# Altium PCB XCZU15EG-F V1.0尺寸图.PcbDoc (part 2 of 2)
Units mil, origin at the board's own origin, x right, y up, seen from the top; angles counter-clockwise.
Board outline 7030 x 5980 mil, 2 copper layers (TOP, BOT), stack 10.74 mil thick; 40 components, 760 nets, 1412 pads, 0 vias.
Unrouted connection lines stored in the file: 737.
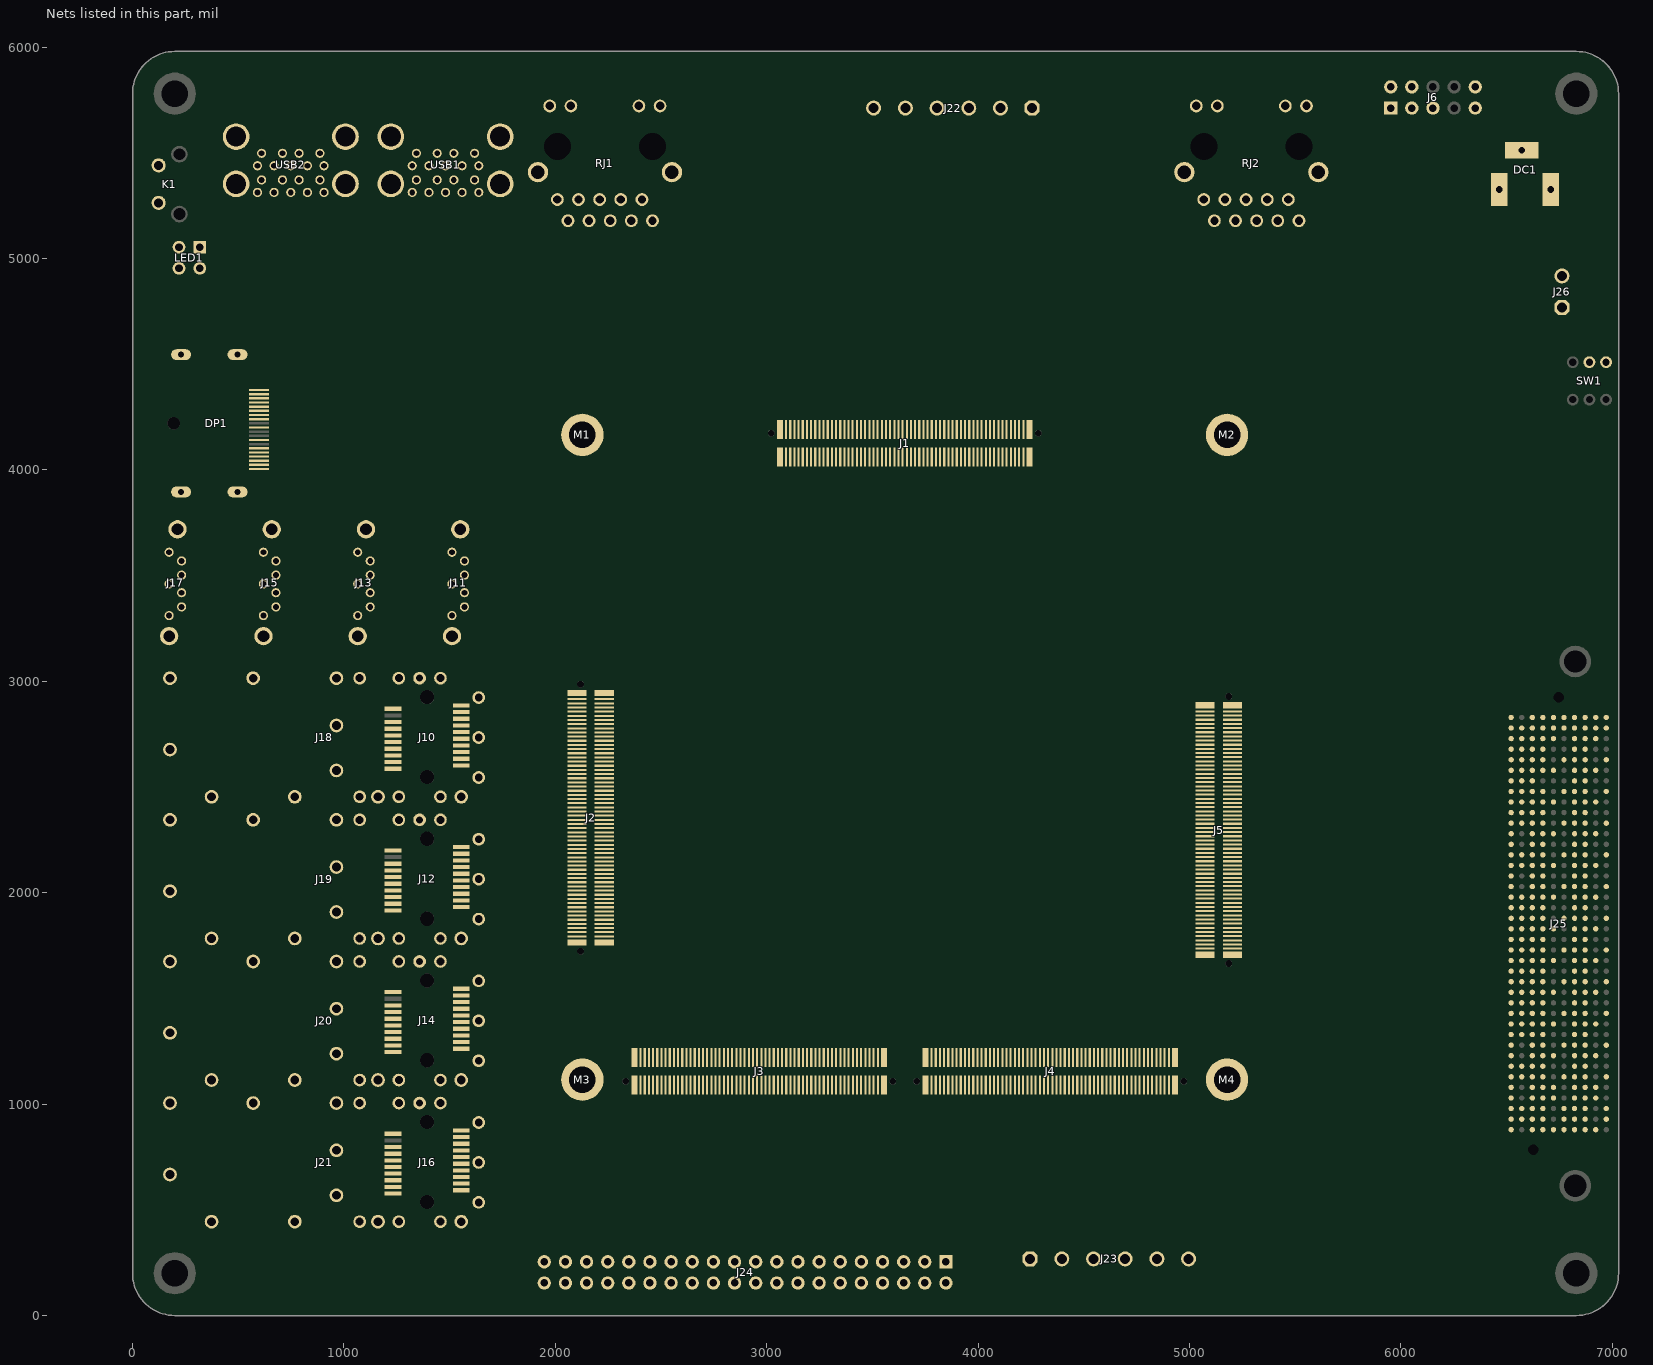
[diagram p2: the nets of this part, all layers, seen from the top]

## Part data
DC1: library part DC-470-2.1GP, BOM_JLCPCB Part Class="Extended Part", BOM_Manufacturer=GANGYUAN, BOM_Manufacturer Part=DC-470-2.1GP, BOM_Supplier=LCSC, BOM_Supplier Part=C194407, Contributor=LCSC, spicePre=D, spiceSymbolName=DC-470-2.1GP
DP1: Current Rating (Max)=500mA, JLCPCB Part Class="Extended Part", LCSC Part Name="DisplayPort 母 P数:20 DP 有弹无卡点", Manufacturer=华宇创, Operating Temperature Range=-25℃~+85℃, Add into BOM=yes, Connector Type=DisplayPort, Convert to PCB=yes, Datasheet=https://atta.szlcsc.com/upload/public/pdf/source/20200812/C711350_819FDC86A5F88806D55082D40EAA95DA.pdf, Device=HYC16-DP20-178, Gender=母, Manufacturer Part=HYC16-DP20-178, Mounting Style=卧贴, Name=HYC16-DP20-178, Number of Pins=20, Number of Rows=-, Supplier=LCSC, Supplier Footprint=SMD, Supplier Part=C711350, Symbol=HYC16-DP20-178
J10 J12 J14 J16: JLCPCB Part Class="Extended Part", LCSC Part Name="SFP 0.8mm P数:20", Manufacturer="TE Connectivity(美国泰科)", Operating Temperature Range=-, Add into BOM=yes, Connector Type=SFP, Convert to PCB=yes, Datasheet=https://atta.szlcsc.com/upload/public/pdf/source/20180424/C210158_9AFB8833F6096AB4A074A402FFBE4003.pdf, Device=1367073-1, Height Above Board=5.4mm, Manufacturer Part=1367073-1, Mounting Style=卧贴, Name=1367073-1, Number of Pins=20, Pitch=0.8mm, Supplier=LCSC, Supplier Footprint=SMD,P=0.8mm, Supplier Part=C210158, Symbol=1367073-1
J18 J19 J20 J21: JLCPCB Part Class="Extended Part", LCSC Part Name=SFP外壳, Manufacturer=HCTL(华灿天禄), Add into BOM=yes, Convert to PCB=yes, Datasheet=https://atta.szlcsc.com/upload/public/pdf/source/20230418/28FB36C4D88CF8CA324EA23CADB75FA2.pdf, Device=HC-SFP-01L, Manufacturer Part=HC-SFP-01L, Name=HC-SFP-01L, Supplier=LCSC, Supplier Footprint=-, Supplier Part=C2897292, Symbol=HC-SFP-01L
J22 J23: library part J-3.81-R-1X06P, "插拔式接线端子（弯针）  品牌：凯峰", 物料编码=6341.000869
J25: library part ASP_134486_0
J26: library part WJ15EDGVC-3.81-2P, "插拔式接线端子（弯针）KF2EDGR-Y-3.81-2P-1G，品牌：凯峰", BOM_Manufacturer=ReliaPro, BOM_Manufacturer Part=WJ15EDGVC-3.81-2P, BOM_Supplier=LCSC, BOM_Supplier Part=C8396, image=//image.lceda.cn/szlcsc/C8396.jpg, spicePre=X, spiceSymbolName=WJ15EDGVC-3.81-2P, 物料编码=6341.000873
K1: Contact Current=50mA, JLCPCB Part Class="Extended Part", LCSC Part Name="7*3.5*1.24mm 卧插 轻触开关", Manufacturer="TE Connectivity(美国泰科)", Voltage Rating (DC)=24V, Actuator Style=圆形按钮, Add into BOM=yes, Circuit=单刀单掷, Convert to PCB=yes, Datasheet=https://atta.szlcsc.com/upload/public/pdf/source/20161105/1478330327555.pdf, Device=1825027-5, Manufacturer Part=1825027-5, Mechanical Life=-, Mounting Style=卧插, Name=1825027-5, Supplier=LCSC, Supplier Footprint=插件, Supplier Part=C86476, Switch Height=1.24mm, Switch Length=7mm, Switch Width=3.5mm, Symbol=1825027-5, With Lamp=-
LED1: Color Temperature=-, Emitted Color=橙红,普绿/黄绿, Forward Current=20mA, JLCPCB Part Class="Extended Part", Lens Color=雾状绿；雾状红, Manufacturer=MEIHUA(美华), Operating Temperature=-25℃~+85℃, Power Dissipation=78mW, Add into BOM=yes, Convert to PCB=yes, Datasheet=https://atta.szlcsc.com/upload/public/pdf/source/20220214/0A6E4FC1FFE28EF73BAB3827A18F262D.pdf, Device=MHK2396EGBTD, Diode Configuration=-, Dominant Wavelength=568nm；628nm, Lamp Holder Type=组装式圆形灯头, LCSC Part Name=橙红,普绿/黄绿, Manufacturer Part=MHK2396EGBTD, Mounting Sytle=-, Name=MHK2396EGBTD, Peak Wavelength=-, Supplier=LCSC, Supplier Footprint=插件, Supplier Part=C2962099, Symbol=MHK2396EGBTD, Viewing Angle=80°
M1 M2 M3 M4 M5 M6 M7 M8: "测试点"
RJ1 RJ2: BOM_JLCPCB Part Class="Extended Part", BOM_Manufacturer=HANRUN, BOM_Manufacturer Part=HR911130A, BOM_Supplier=LCSC, BOM_Supplier Part=C54408, spicePre=R, spiceSymbolName=HR911130A
SW1: BOM_JLCPCB Part Class="Extended Part", BOM_Manufacturer="XKB Enterprise", BOM_Manufacturer Part=XKB5858-Z, BOM_Supplier=LCSC, BOM_Supplier Part=C318868, Contributor=LCSC, spicePre=S, spiceSymbolName=XKB5858-Z
USB1 USB2: Current Rating - Power (Max)=1.8A, JLCPCB Part Class="Extended Part", LCSC Part Name="Type-A 母座 弯插 双层9短体", Manufacturer=XUNPU(讯普), Operating Temperature Range=-30℃~+85℃, Welding Temperature (Max)=260℃, Add into BOM=yes, Connector Type=Type-A, Convert to PCB=yes, Datasheet=https://atta.szlcsc.com/upload/public/pdf/source/20210908/0D45B3E84ED0AF593A84F7C1203CC555.pdf, Device=USB-303WSD-BRY, Gender=母座, Manufacturer Part=USB-303WSD-BRY, Mounting Style=弯插, Name=USB-303WSD-BRY, Number of Contacts=9+9, Number of Ports=2, Standard="USB 3.0", Supplier=LCSC, Supplier Footprint=插件, Supplier Part=C2895028, Symbol=USB-303WSD-BRY
J1 J2 J3 J4 J5: Designer=U?, Device=AXK6A2337YG, Symbol=AXK6A2337YG

## Nets (pads, with @x,y where several pads share a name; then routed paths per layer and width w, separated by ;. In a path a pad name is that pad's centre, name@x,y a point inside that pad or via, vN(x,y) a via of type N, cw(c..) or ccw(c..) an arc to the next point about the centre after c; other vN are vias at no path point)
1.8V: J25.E39 J25.F40 J25.G39 J25.H40 J25.J39 J25.K40
3.3V: J6.4 J24.39 J24.40 J25.C39 J25.D32 J25.D36 J25.D38 J25.D40 LED1.1 LED1.4 RJ1.11 RJ2.11
5V-TC1: 
5V-TC2: 
128_CLK1_N: J2.69
128_CLK1_P: J2.67
129_CLK0_N: J2.81
129_CLK0_P: J2.79
130_CLK0_N: J3.5
130_CLK0_P: J3.3
130_CLK1_N: J3.17
130_CLK1_P: J3.15
130_RX0_N: J3.6
130_RX0_P: J3.4
130_RX1_N: J3.12
130_RX1_P: J3.10
130_RX2_N: J3.18
130_RX2_P: J3.16
130_RX3_N: J3.24
130_RX3_P: J3.22
130_TX0_N: J3.11
130_TX0_P: J3.9
130_TX1_N: J3.23
130_TX1_P: J3.21
130_TX2_N: J3.29
130_TX2_P: J3.27
130_TX3_N: J3.30
130_TX3_P: J3.28
230_CLK0_N: J4.41
230_CLK0_P: J4.39
230_CLK1_N: J4.35
230_CLK1_P: J4.33
230_RX0_N: J4.59
230_RX0_P: J4.57
230_RX1_N: J4.60
230_RX1_P: J4.58
230_RX2_N: J4.54
230_RX2_P: J4.52
230_RX3_N: J4.48
230_RX3_P: J4.46
230_TX0_N: J4.53
230_TX0_P: J4.51
230_TX1_N: J4.47
230_TX1_P: J4.45
230_TX2_N: J4.42
230_TX2_P: J4.40
230_TX3_N: J4.36
230_TX3_P: J4.34
505_CLK3_N: J2.46
505_CLK3_P: J2.44
505_DP_CLK_N: J2.45
505_DP_CLK_P: J2.43
505_DP_CLKCC_N: 
505_DP_CLKCC_P: 
505_PCIE_REFCLK_N: J2.21
505_PCIE_REFCLK_P: J2.19
505_PCIE_REFCLKCC_N: 
505_PCIE_REFCLKCC_P: 
505_RX2_N: J2.28
505_RX2_P: J2.26
505_RX3_N: J2.40
505_RX3_P: J2.38
505_USB_CLK_N: J2.33
505_USB_CLK_P: J2.31
505_USB_CLKCC_N: 
505_USB_CLKCC_P: 
505_USB_CLKCCCC_N: 
505_USB_CLKCCCC_P: 
+5V: J24.2
+12V: J1.5 J1.6 J1.7 J1.8 J1.9 J1.10 J1.11 J1.12 J1.13 J1.14 J1.15 J1.16 J1.17 J1.18 J1.19 J1.20 J1.21 J1.22 J1.23 J1.24 J1.25 J1.26 J1.27 J1.28 J1.29 J1.30 J1.31 J1.32 J1.33 J1.34 J1.35 J1.36 J1.37 J1.38 J1.39 J1.40 J1.41 J1.42 J1.43 J1.44 J1.45 J1.46 J25.C35 J25.C37
AD9523_CS: J3.119
AD9523_EE_SEL: 
AD9523_RST: 
AD9523_SCLK: J3.117
AD9523_SDIO: J3.115
AD9523_SDO: J3.113
B48_L1_N: J3.73
B48_L1_P: J3.75
B48_L2_N: J3.88
B48_L2_P: J3.90
B48_L3_N: J3.77
B48_L3_P: J3.79
B48_L4_N: J3.84
B48_L4_P: J3.86
B48_L5_N: J3.83
B48_L5_P: J3.85
B48_L6_N: J3.87
B48_L6_P: J3.89
B48_L8_N: J3.78
B48_L8_P: J3.80
B50_L1_N: J4.29
B50_L1_P: J4.27
B50_L3_N: J4.30
B50_L3_P: J4.28
B50_L4_N: J4.20
B50_L4_P: J4.18
B50_L5_P: J4.17
B50_L7_N: J4.16
B50_L7_P: J4.14
B50_L8_N: J4.26
B50_L8_P: J4.24
B50_L9_N: J4.10
B50_L9_P: J4.8
B50_L10_N: J4.6
B50_L10_P: J4.4
B66_L4_N: J5.119
CAM1_CLK: J4.5
CAM1_GPIO: J4.3
CAM_SCL: J4.7
CAM_SDA: J4.9
CAN1_H: J22.6
CAN1_L: J22.5
CAN1_RX: 
CAN1_TX: 
CAN2_H: J22.3
CAN2_L: J22.2
CAN2_RX: 
CAN2_TX: 
CH340_UART_RX: 
CH340_UART_TX: 
D01_N: 
D01_P: 
DP_3V3: DP1.20
DP_AUX_IN_MIO30: J1.83
DP_AUX_OUT_MIO27: J1.101
DP_HPD_LS: 
DP_HPD_LS_C: DP1.18
DP_HPD_MIO28: J1.103
DP_OE_MIO29: J1.72
DPAUX_C_N: DP1.17
DPAUX_C_P: DP1.15
DPAUX_N: 
DPAUX_P: 
FAN: J4.19
FMC_CLK0_N: J5.28 J25.H5
FMC_CLK0_P: J5.30 J25.H4
FMC_CLK1_N: J5.80 J25.G3
FMC_CLK1_P: J5.78 J25.G2
FMC_DP0_C2M_N: J4.120 J25.C3
FMC_DP0_C2M_P: J4.118 J25.C2
FMC_DP0_M2C_N: J4.119 J25.C7
FMC_DP0_M2C_P: J4.117 J25.C6
FMC_DP1_C2M_N: J4.114 J25.A23
FMC_DP1_C2M_P: J4.112 J25.A22
FMC_DP1_M2C_N: J4.113 J25.A3
FMC_DP1_M2C_P: J4.111 J25.A2
FMC_DP2_C2M_N: J4.108 J25.A27
FMC_DP2_C2M_P: J4.106 J25.A26
FMC_DP2_M2C_N: J4.107 J25.A7
FMC_DP2_M2C_P: J4.105 J25.A6
FMC_DP3_C2M_N: J4.102 J25.A31
FMC_DP3_C2M_P: J4.100 J25.A30
FMC_DP3_M2C_N: J4.101 J25.A11
FMC_DP3_M2C_P: J4.99 J25.A10
FMC_DP4_C2M_N: J4.89 J25.A35
FMC_DP4_C2M_P: J4.87 J25.A34
FMC_DP4_M2C_N: J4.90 J25.A15
FMC_DP4_M2C_P: J4.88 J25.A14
FMC_DP5_C2M_N: J4.83 J25.A39
FMC_DP5_C2M_P: J4.81 J25.A38
FMC_DP5_M2C_N: J4.84 J25.A19
FMC_DP5_M2C_P: J4.82 J25.A18
FMC_DP6_C2M_N: J4.72 J25.B37
FMC_DP6_C2M_P: J4.70 J25.B36
FMC_DP6_M2C_N: J4.78 J25.B17
FMC_DP6_M2C_P: J4.76 J25.B16
FMC_DP7_C2M_N: J4.71 J25.B33
FMC_DP7_C2M_P: J4.69 J25.B32
FMC_DP7_M2C_N: J4.66 J25.B13
FMC_DP7_M2C_P: J4.64 J25.B12
FMC_GBTCLK0_M2C_N: J4.96 J25.D5
FMC_GBTCLK0_M2C_P: J4.94 J25.D4
FMC_GBTCLK1_M2C_N: J4.77 J25.B21
FMC_GBTCLK1_M2C_P: J4.75 J25.B20
FMC_HDMI_SCL: J4.23 J25.C30
FMC_HDMI_SDA: J4.25 J25.C31
FMC_LA00_CC_N: J5.34 J25.G7
FMC_LA00_CC_P: J5.36 J25.G6
FMC_LA01_CC_N: J5.38 J25.D9
FMC_LA01_CC_P: J5.40 J25.D8
FMC_LA02_N: J5.3 J25.H8
FMC_LA02_P: J5.5 J25.H7
FMC_LA03_N: J5.7 J25.G10
FMC_LA03_P: J5.9 J25.G9
FMC_LA04_N: J5.13 J25.H11
FMC_LA04_P: J5.15 J25.H10
FMC_LA05_N: J5.8 J25.D12
FMC_LA05_P: J5.10 J25.D11
FMC_LA06_N: J5.4 J25.C11
FMC_LA06_P: J5.6 J25.C10
FMC_LA07_N: J5.17 J25.H14
FMC_LA07_P: J5.19 J25.H13
FMC_LA08_N: J5.14 J25.G13
FMC_LA08_P: J5.16 J25.G12
FMC_LA09_N: J5.18 J25.D15
FMC_LA09_P: J5.20 J25.D14
FMC_LA10_N: J5.23 J25.C15
FMC_LA10_P: J5.25 J25.C14
FMC_LA11_N: J5.37 J25.H17
FMC_LA11_P: J5.39 J25.H16
FMC_LA12_N: J5.24 J25.G16
FMC_LA12_P: J5.26 J25.G15
FMC_LA13_N: J5.44 J25.D18
FMC_LA13_P: J5.46 J25.D17
FMC_LA14_N: J5.43 J25.C19
FMC_LA14_P: J5.45 J25.C18
FMC_LA15_N: J5.53 J25.H20
FMC_LA15_P: J5.55 J25.H19
FMC_LA16_N: J5.48 J25.G19
FMC_LA16_P: J5.50 J25.G18
FMC_LA17_CC_N: J5.90 J25.D21
FMC_LA17_CC_P: J5.88 J25.D20
FMC_LA18_CC_N: J5.96 J25.C23
FMC_LA18_CC_P: J5.94 J25.C22
FMC_LA19_N: J5.54 J25.H23
FMC_LA19_P: J5.56 J25.H22
FMC_LA20_N: J5.57 J25.G22
FMC_LA20_P: J5.59 J25.G21
FMC_LA21_N: J5.60 J25.H26
FMC_LA21_P: J5.58 J25.H25
FMC_LA22_N: J5.75 J25.G25
FMC_LA22_P: J5.73 J25.G24
FMC_LA23_N: J5.69 J25.D24
FMC_LA23_P: J5.67 J25.D23
FMC_LA24_N: J5.76 J25.H29
FMC_LA24_P: J5.74 J25.H28
FMC_LA25_N: J5.70 J25.G28
FMC_LA25_P: J5.68 J25.G27
FMC_LA26_N: J5.66 J25.D27
FMC_LA26_P: J5.64 J25.D26
FMC_LA27_N: J5.79 J25.C27
FMC_LA27_P: J5.77 J25.C26
FMC_LA28_N: J5.100 J25.H32
FMC_LA28_P: J5.98 J25.H31
FMC_LA29_N: J5.86 J25.G31
FMC_LA29_P: J5.84 J25.G30
FMC_LA30_N: J5.110 J25.H35
FMC_LA30_P: J5.108 J25.H34
FMC_LA31_N: J5.106 J25.G34
FMC_LA31_P: J5.104 J25.G33
FMC_LA32_N: J5.120 J25.H38
FMC_LA32_P: J5.118 J25.H37
FMC_LA33_N: J5.116 J25.G37
FMC_LA33_P: J5.114 J25.G36
FMC_PG: J25.F1
FMC_PRSNT: J4.15 J25.H2
FMC_TCK: J25.D29
FMC_TDI: J25.D30
FMC_TDO: J25.D31
FMC_TMS: J25.D33
FMC_VREF: J25.H1
FPGA_DONE: J1.54
FPGA_TCK: J1.62 J6.1
FPGA_TDI: J1.68 J6.9
FPGA_TDO: J1.66
FPGA_TMS: J1.64 J6.5
GND: DC1.2 DC1.3 DP1.2 DP1.5 DP1.8 DP1.11 DP1.16 DP1.19 DP1.21 DP1.22 DP1.23 DP1.24 J1.1 J1.2 J1.3 J1.4 J1.47 J1.48 J1.49 J1.50 J1.59 J1.60 J1.69 J1.70 J1.76 J1.79 J1.86 J1.89 J1.99 J1.100 J1.109 J1.114 J1.119 J1.120 J2.1 J2.2 J2.3 J2.4 J2.5 J2.6 J2.7 J2.8 J2.9 J2.10 J2.11 J2.12 J2.17 J2.18 J2.23 J2.24 J2.29 J2.30 J2.35 J2.36 J2.41 J2.42 J2.47 J2.48 J2.53 J2.54 J2.59 J2.60 J2.65 J2.66 J2.71 J2.72 J2.77 J2.78 J2.83 J2.84 J2.89 J2.90 J2.95 J2.96 J2.101 J2.102 J2.107 J2.108 J3.1 J3.2 J3.7 J3.8 J3.13 J3.14 J3.19 J3.20 J3.25 J3.26 J3.31 J3.32 J3.41 J3.42 J3.51 J3.52 J3.61 J3.62 J3.71 J3.72 J3.81 J3.82 J3.91 J3.92 J3.101 J3.102 J3.111 J3.112 J4.1 J4.2 J4.11 J4.12 J4.21 J4.22 J4.31 J4.32 J4.37 J4.38 J4.43 J4.44 J4.49 J4.50 J4.55 J4.56 J4.61 J4.62 J4.67 J4.68 J4.73 J4.74 J4.79 J4.80 J4.85 J4.86 J4.91 J4.92 J4.97 J4.98 J4.103 J4.104 J4.109 J4.110 J4.115 J4.116 J5.1 J5.2 J5.11 J5.12 J5.21 J5.22 J5.31 J5.32 J5.41 J5.42 J5.51 J5.52 J5.61 J5.62 J5.71 J5.72 J5.81 J5.82 J5.91 J5.92 J5.101 J5.102 J5.111 J5.112 J6.2 J6.10 J10.1 J10.10 J10.11 J10.14 J10.17 J10.20 J11.1 J11.4 J11.7 J11.8 J11.9 J12.1 J12.10 J12.11 J12.14 J12.17 J12.20 J13.1 J13.4 J13.7 J13.8 J13.9 J14.1 J14.10 J14.11 J14.14 J14.17 J14.20 J15.1 J15.4 J15.7 J15.8 J15.9 J16.1 J16.10 J16.11 J16.14 J16.17 J16.20 J17.1 J17.4 J17.7 J17.8 J17.9 J18.1 J18.2 J18.3 J18.4 J18.5 J18.6 J18.7 J18.8 J18.9 J18.10 J18.11 J18.12 J18.13 J18.14 J18.15 J18.16 J18.17 J18.18 J18.19 J18.20 J19.1 J19.2 J19.3 J19.4 J19.5 J19.6 J19.7 J19.8 J19.9 J19.10 J19.11 J19.12 J19.13 J19.14 J19.15 J19.16 J19.17 J19.18 J19.19 J19.20 J20.1 J20.2 J20.3 J20.4 J20.5 J20.6 J20.7 J20.8 J20.9 J20.10 J20.11 J20.12 J20.13 J20.14 J20.15 J20.16 J20.17 J20.18 J20.19 J20.20 J21.1 J21.2 J21.3 J21.4 J21.5 J21.6 J21.7 J21.8 J21.9 J21.10 J21.11 J21.12 J21.13 J21.14 J21.15 J21.16 J21.17 J21.18 J21.19 J21.20 J22.1 J22.4 J23.1 J23.4 J24.1 J24.37 J24.38 J25.A1 J25.A4 J25.A5 J25.A8 J25.A9 J25.A12 J25.A13 J25.A16 J25.A17 J25.A20 J25.A21 J25.A24 J25.A25 J25.A28 J25.A29 J25.A32 J25.A33 J25.A36 J25.A37 J25.A40 J25.B2 J25.B3 J25.B6 J25.B7 J25.B10 J25.B11 J25.B14 J25.B15 J25.B18 J25.B19 J25.B22 J25.B23 J25.B26 J25.B27 J25.B30 J25.B31 J25.B34 J25.B35 J25.B38 J25.B39 J25.C1 J25.C4 J25.C5 J25.C8 J25.C9 J25.C12 J25.C13 J25.C16 J25.C17 J25.C20 J25.C21 J25.C24 J25.C25 J25.C28 J25.C29 J25.C32 J25.C33 J25.C34 J25.C36 J25.C38 J25.C40 J25.D2 J25.D3 J25.D6 J25.D7 J25.D10 J25.D13 J25.D16 J25.D19 J25.D22 J25.D25 J25.D28 J25.D35 J25.D37 J25.D39 J25.E1 J25.E4 J25.E5 J25.E8 J25.E11 J25.E14 J25.E17 J25.E20 J25.E23 J25.E26 J25.E29 J25.E32 J25.E35 J25.E38 J25.E40 J25.F2 J25.F3 J25.F6 J25.F9 J25.F12 J25.F15 J25.F18 J25.F21 J25.F24 J25.F27 J25.F30 J25.F33 J25.F36 J25.F39 J25.G1 J25.G4 J25.G5 J25.G8 J25.G11 J25.G14 J25.G17 J25.G20 J25.G23 J25.G26 J25.G29 J25.G32 J25.G35 J25.G38 J25.G40 J25.H3 J25.H6 J25.H9 J25.H12 J25.H15 J25.H18 J25.H21 J25.H24 J25.H27 J25.H30 J25.H33 J25.H36 J25.H39 J25.J1 J25.J4 J25.J5 J25.J8 J25.J11 J25.J14 J25.J17 J25.J20 J25.J23 J25.J26 J25.J29 J25.J32 J25.J35 J25.J38 J25.J40 J25.K2 J25.K3 J25.K6 J25.K9 J25.K12 J25.K15 J25.K18 J25.K21 J25.K24 J25.K27 J25.K30 J25.K33 J25.K36 J25.K39 J26.2 K1.1 M1.1 M2.1 M3.1 M4.1 RJ1.10 RJ1.15 RJ1.16 RJ2.10 RJ2.15 RJ2.16 USB1.4 USB1.7 USB1.13 USB1.16 USB1.19 USB1.20 USB1.21 USB1.22 USB2.4 USB2.7 USB2.13 USB2.16 USB2.19 USB2.20 USB2.21 USB2.22
GT0_DP_TX_C_N: DP1.3
GT0_DP_TX_C_P: DP1.1
GT0_DP_TX_N: J2.39
GT0_DP_TX_P: J2.37
GT1_DP_TX_C_N: DP1.6
GT1_DP_TX_C_P: DP1.4
GT1_DP_TX_N: J2.34
GT1_DP_TX_P: J2.32
HUB_3.3V: 
HUB_AV12: 
HUB_DV12: 
HUB_RESET: 
IO1_N: J3.74 J24.3
IO1_P: J3.76 J24.4
IO2_N: J3.67 J24.5
IO2_P: J3.69 J24.6
IO3_N: J3.68 J24.7
IO3_P: J3.70 J24.8
IO4_N: J3.63 J24.9
IO4_P: J3.65 J24.10
IO5_N: J3.64 J24.11
IO5_P: J3.66 J24.12
IO6_N: J3.57 J24.13
IO6_P: J3.59 J24.14
IO7_N: J3.58 J24.15
IO7_P: J3.60 J24.16
IO8_N: J3.53 J24.17
IO8_P: J3.55 J24.18
IO9_N: J3.54 J24.19
IO9_P: J3.56 J24.20
IO10_N: J3.47 J24.21
IO10_P: J3.49 J24.22
IO11_N: J3.48 J24.23
IO11_P: J3.50 J24.24
IO12_N: J3.43 J24.25
IO12_P: J3.45 J24.26
IO13_N: J3.44 J24.27
IO13_P: J3.46 J24.28
IO14_N: J3.37 J24.29
IO14_P: J3.39 J24.30
IO15_N: J3.38 J24.31
IO15_P: J3.40 J24.32
IO16_N: J3.33 J24.33
IO16_P: J3.35 J24.34
IO17_N: J3.34 J24.35
IO17_P: J3.36 J24.36
JTAG_TDO: J6.3
MIPI1_CLK_N: J5.63
MIPI1_CLK_P: J5.65
MIPI1_LAN0_N: J5.33
MIPI1_LAN0_P: J5.35
MIPI1_LAN1_N: J5.47
MIPI1_LAN1_P: J5.49
NetB1_1: 
NetB1_2: 
NetB1_3: 
NetB1_4: 
NetC8_2: 
NetC11_1: RJ1.1
NetC26_2: 
NetC29_1: RJ2.1
NetC44_2: 
NetC50_2: 
NetC55_1: 
NetC55_2: 
NetC57_2: 
NetC135_2: 
NetC138_2: 
NetC202_1: J10.16
NetC208_2: J10.15
NetC212_1: J12.16
NetC218_2: J12.15
NetC222_1: J14.16
NetC228_2: J14.15
NetC232_1: J16.16
NetC238_2: J16.15
NetC246_2: 
NetC248_2: 
NetC273_1: 
NetC273_2: 
NetC282_2: 
NetC283_2: 
NetC284_2: 
NetC291_1: 
NetC291_2: 
NetC300_2: 
NetC301_2: 
NetC302_2: 
NetC303_1: 
NetC303_2: 
NetC312_2: 
NetC313_2: 
NetC314_2: 
NetD2_2: 
NetD13_A: 
NetD13_K: SW1.2
NetD14_1: DC1.1 J26.1
NetD15_A: 
NetD15_K: 
NetDP1_13: DP1.13
NetDP1_14: DP1.14
NetJ9_69: 
NetJ10_4: J10.4
NetJ10_5: J10.5
NetJ10_6: J10.6
NetJ10_7: J10.7
NetJ10_9: J10.9
NetJ12_4: J12.4
NetJ12_5: J12.5
NetJ12_6: J12.6
NetJ12_7: J12.7
NetJ12_9: J12.9
NetJ14_4: J14.4
NetJ14_5: J14.5
NetJ14_6: J14.6
NetJ14_7: J14.7
NetJ14_9: J14.9
NetJ16_4: J16.4
NetJ16_5: J16.5
NetJ16_6: J16.6
NetJ16_7: J16.7
NetJ16_9: J16.9
NetL15_1: 
NetL17_1: 
NetL19_1: 
NetL21_1: 
NetL22_1: 
NetLED1_2: LED1.2
NetLED1_3: LED1.3
NetLED2_K: 
NetLED3_K: 
NetLED4_K: 
NetLED5_K: 
NetLED6_K: 
NetLED7_K: 
NetLED8_K: 
NetLED9_K: 
NetQ1_1: 
NetQ1_3: 
NetQ2_1: 
NetQ2_3: 
NetQ3_3: 
NetQ4_1: 
NetQ4_3: 
NetQ5_1: 
NetQ5_3: 
NetQ6_1: 
NetQ6_3: 
NetQ7_1: 
NetQ7_3: 
NetQ8_1: 
NetQ8_3: 
NetQ9_1: 
NetQ9_3: 
NetQ10_3: 
NetQ11_1: 
NetQ12_1: SW1.3
NetR7_2: 
NetR33_1: RJ1.12
NetR34_2: RJ1.13
NetR35_1: 
NetR50_1: RJ2.12
NetR51_2: RJ2.13
NetR52_1: 
NetR65_1: 
NetR66_2: 
NetR68_2: 
NetR70_2: 
NetR71_1: 
NetR85_2: 
NetR86_2: 
NetR87_1: 
NetR88_1: 
NetR89_1: 
NetR98_1: 
NetR100_2: 
NetR101_2: 
NetR104_2: 
NetR106_2: 
NetR107_2: 
NetR139_1: 
NetR140_1: 
NetR141_1: 
NetR142_1: 
NetR144_1: 
NetR145_2: 
NetR146_1: 
NetR147_2: 
NetR160_2: 
NetR162_2: 
NetR165_2: 
NetR168_2: 
NetR169_2: 
NetR175_2: 
NetR177_2: 
NetSD1_1: 
NetSD1_5: 
NetSD1_7: 
NetSD1_8: 
NetU4_10: 
NetU5_11: 
NetU5_12: 
NetU5_13: 
OVCUR1#: 
OVCUR2#: 
OVCUR3#: 
OVCUR4#: 
P_SPI_CK: 
P_SPI_CZ: 
P_SPI_DI: 
P_SPI_DO: 
PCIE_PEDET_MIO36: J1.81
PCIE_REFCLK_N: 
PCIE_REFCLK_P: 
PCIE_REFCLKCC_N: 
PCIE_REFCLKCC_P: 
PCIE_RST_N: 
PCIE_RST_N_MIO37: J1.95
PCIE_RX_C_N: J2.16
PCIE_RX_C_P: J2.14
PCIE_TX_C_N: 
PCIE_TX_C_P: 
PCIE_TX_N: J2.15
PCIE_TX_P: J2.13
PG_1.8V: 
PG_3.3V: 
PG_5V: 
PGND: 
PHY1_ADVDDL: 
PHY1_AVDD33: 
PHY1_DVDDL: 
PHY1_INT_N: 
PHY1_IODVDD: 
PHY1_LED1: RJ1.14
PHY1_LED2: 
PHY1_MDC: J1.118
PHY1_MDI0_N: RJ1.3
PHY1_MDI0_P: RJ1.2
PHY1_MDI1_N: RJ1.7
PHY1_MDI1_P: RJ1.4
PHY1_MDI2_N: RJ1.6
PHY1_MDI2_P: RJ1.5
PHY1_MDI3_N: RJ1.9
PHY1_MDI3_P: RJ1.8
PHY1_MDIO: J1.116
PHY1_REGOUT: 
PHY1_RSET: 
PHY1_RXCK: J1.88
PHY1_RXCTL: J1.90
PHY1_RXD0: J1.92
PHY1_RXD1: J1.94
PHY1_RXD2: J1.96
PHY1_RXD3: J1.98
PHY1_TXCK: J1.102
PHY1_TXCTL: J1.104
PHY1_TXD0: J1.106
PHY1_TXD1: J1.108
PHY1_TXD2: J1.110
PHY1_TXD3: J1.112
PHY1_XI: 
PHY1_XO: 
PHY2_ADVDDL: 
PHY2_AVDD33: 
PHY2_DVDDL: 
PHY2_INT_N: 
PHY2_IODVDD: 
PHY2_LED1: RJ2.14
PHY2_LED2: 
PHY2_MDC: J5.85
PHY2_MDI0_N: RJ2.3
PHY2_MDI0_P: RJ2.2
PHY2_MDI1_N: RJ2.7
PHY2_MDI1_P: RJ2.4
PHY2_MDI2_N: RJ2.6
PHY2_MDI2_P: RJ2.5
PHY2_MDI3_N: RJ2.9
PHY2_MDI3_P: RJ2.8
PHY2_MDIO: J5.87
PHY2_REGOUT: 
PHY2_RSET: 
PHY2_RST: J5.83
PHY2_RXCK: J5.93
PHY2_RXCTL: J5.117
PHY2_RXD0: J5.115
PHY2_RXD1: J5.113
PHY2_RXD2: J5.109
PHY2_RXD3: J5.107
PHY2_TXCK: J5.105
PHY2_TXCTL: J5.103
PHY2_TXD0: J5.99
PHY2_TXD1: J5.97
PHY2_TXD2: J5.95
PHY2_TXD3: J5.89
PHY2_XI: 
PHY2_XO: 
PL_CH340_N: 
PL_CH340_P: 
PL_KEY1: J3.98
PL_KEY2: J3.100
PL_LED1: J3.94
PL_LED2: J3.96
PL_UART_RX: J3.104
PL_UART_TX: J3.106
PLL_128_CLK0_N: J2.57
PLL_128_CLK0_P: J2.55
PLL_128_CLK0CC_N: 
PLL_128_CLK0CC_P: 
PLL_129_CLK0CC_N: 
PLL_129_CLK0CC_P: 
PLL_129_CLK1_N: J2.93
PLL_129_CLK1_P: J2.91
PLL_129_CLK1CC_N: 
PLL_129_CLK1CC_P: 
PLL_228_CLK1_N: J4.95
PLL_228_CLK1_P: J4.93
PLL_228_CLK1CC_N: 
PLL_228_CLK1CC_P: 
PLL_229_CLK1_N: J4.65
PLL_229_CLK1_P: J4.63
PLL_229_CLK1CC_N: 
PLL_229_CLK1CC_P: 
PLL_B67_L13_N: J5.27
PLL_B67_L13_P: J5.29
PLL_B67_L13CC_N: 
PLL_B67_L13CC_P: 
PLL_PHY1_CLK: 
PLL_PHY2_CLK: 
PLL_USB_CLK: 
PLL_USBHUB_CLK: 
POWER_SW: J1.57 K1.2
PS_CAN1_RX_MIO38: J1.77
PS_CAN1_TX_MIO39: J1.97
PS_CAN2_RX_MIO33: J1.80
PS_CAN2_TX_MIO32: J1.84
PS_CH340_N: 
PS_CH340_P: 
PS_ERROR_OUT: J1.53
PS_ERROR_STATUS: J1.51
PS_IIC1_C_SCL: J1.56
PS_IIC1_C_SDA: J1.58
PS_KEY1: J1.85
PS_KEY2: J1.75
PS_LED1: J1.107
PS_LED2: J1.105
PS_LED3: J1.74
PS_LED4: J1.82
PS_MODE0: J1.65
PS_MODE1: J1.63
PS_MODE2: J1.67
PS_MODE3: J1.61
PS_POR_B: J1.55
PS_UART_RX_MIO42: J1.91
PS_UART_TX_MIO43: J1.71
PWREN1#: 
PWREN2#: 
PWREN3#: 
PWREN4#: 
PWRGD: J4.13 J25.D1
RS485_1A: J23.6
RS485_1B: J23.5
RS485_2A: J23.3
RS485_2B: J23.2
RS485_DE1: J3.110
RS485_DE2: J3.118
RS485_RXD1: J3.108
RS485_RXD2: J3.116
RS485_TXD1: J3.114
RS485_TXD2: J3.120
RX_DS1_N: USB1.14
RX_DS1_P: USB1.15
RX_DS2_N: USB2.5
RX_DS2_P: USB2.6
RX_DS3_N: USB2.14
RX_DS3_P: USB2.15
RX_DS4_N: USB1.5
RX_DS4_P: USB1.6
SATA1_RX_C_N: J11.5
SATA1_RX_C_P: J11.6
SATA1_RX_N: J2.52
SATA1_RX_P: J2.50
SATA1_TX_C_N: J11.3
SATA1_TX_C_P: J11.2
SATA1_TX_N: J2.51
SATA1_TX_P: J2.49
SATA2_RX_C_N: J13.5
SATA2_RX_C_P: J13.6
SATA2_RX_N: J2.64
SATA2_RX_P: J2.62
SATA2_TX_C_N: J13.3
SATA2_TX_C_P: J13.2
SATA2_TX_N: J2.58
SATA2_TX_P: J2.56
SATA3_RX_C_N: J15.5
SATA3_RX_C_P: J15.6
SATA3_RX_N: J2.70
SATA3_RX_P: J2.68
SATA3_TX_C_N: J15.3
SATA3_TX_C_P: J15.2
SATA3_TX_N: J2.63
SATA3_TX_P: J2.61
SATA4_RX_C_N: J17.5
SATA4_RX_C_P: J17.6
SATA4_RX_N: J2.76
SATA4_RX_P: J2.74
SATA4_TX_C_N: J17.3
SATA4_TX_C_P: J17.2
SATA4_TX_N: J2.75
SATA4_TX_P: J2.73
SD_CD: J1.117
SD_CLK: J1.111
SD_CMD: J1.115
SD_D0: J1.78
SD_D1: J1.87
SD_D2: J1.93
SD_D3: J1.73
SFP1_LOSS: J3.107 J10.8
SFP1_RX_N: J2.82 J10.12
SFP1_RX_P: J2.80 J10.13
SFP1_TX_DIS: J3.109 J10.3
SFP1_TX_N: J2.87 J10.19
SFP1_TX_P: J2.85 J10.18
SFP2_LOSS: J3.103 J12.8
SFP2_RX_N: J2.88 J12.12
SFP2_RX_P: J2.86 J12.13
SFP2_TX_DIS: J3.105 J12.3
SFP2_TX_N: J2.94 J12.19
SFP2_TX_P: J2.92 J12.18
SFP3_LOSS: J3.97 J14.8
SFP3_RX_N: J2.100 J14.12
SFP3_RX_P: J2.98 J14.13
SFP3_TX_DIS: J3.99 J14.3
SFP3_TX_N: J2.99 J14.19
SFP3_TX_P: J2.97 J14.18
SFP4_LOSS: J3.93 J16.8
SFP4_RX_N: J2.106 J16.12
SFP4_RX_P: J2.104 J16.13
SFP4_TX_DIS: J3.95 J16.3
SFP4_TX_N: J2.105 J16.19
SFP4_TX_P: J2.103 J16.18
TX_DS1_C_N: USB1.17
TX_DS1_C_P: USB1.18
TX_DS1_N: 
TX_DS1_P: 
TX_DS2_C_N: USB2.8
TX_DS2_C_P: USB2.9
TX_DS2_N: 
TX_DS2_P: 
TX_DS3_C_N: USB2.17
TX_DS3_C_P: USB2.18
TX_DS3_N: 
TX_DS3_P: 
TX_DS4_C_N: USB1.8
TX_DS4_C_P: USB1.9
TX_DS4_N: 
TX_DS4_P: 
USB2.0_RESET: J1.113
USB_1_N: USB1.11
USB_1_P: USB1.12
USB_2_N: USB2.2
USB_2_P: USB2.3
USB_3_N: USB2.11
USB_3_P: USB2.12
USB_4_N: USB1.2
USB_4_P: USB1.3
USB_CLK: J2.114
USB_DATA0: J2.113
USB_DATA1: J2.119
USB_DATA2: J2.109
USB_DATA3: J2.115
USB_DATA4: J2.116
USB_DATA5: J2.111
USB_DATA6: J2.112
USB_DATA7: J2.120
USB_DIR: J2.118
USB_NXT: J2.117
USB_PORT1_5V: 
USB_PORT2_5V: 
USB_PORT3_5V: 
USB_PORT4_5V: 
USB_RX_N: J2.22
USB_RX_P: J2.20
USB_RXUP_N: 
USB_RXUP_P: 
USB_STP: J2.110
USB_TX_N: J2.27
USB_TX_P: J2.25
USB_TXUP_N: 
USB_TXUP_P: 
USB_VPORT1: USB1.10
USB_VPORT2: USB2.1
USB_VPORT3: USB2.10
USB_VPORT4: USB1.1
VBAT_IN: J1.52
VBUS_IN: 
VDD1.8_OUT03: 
VDD1.8_OUT13: 
VDD1.8_OUT49: 
VDD3.3_OUT03: 
VDD3.3_OUT13: 
VDD3.3_OUT49: 
VDD3_PLL: 
VDD3_REF: 
VDD3_VCO: 
pads on no net: DP1.0 DP1.7 DP1.9 DP1.10 DP1.12 J1. J2. J3. J4. J5. J6.6 J6.7 J6.8 J10. J10.2 J12. J12.2 J14. J14.2 J16. J16.2 J25.B1 J25.B4 J25.B5 J25.B8 J25.B9 J25.B24 J25.B25 J25.B28 J25.B29 J25.B40 J25.D34 J25.E2 J25.E3 J25.E6 J25.E7 J25.E9 J25.E10 J25.E12 J25.E13 J25.E15 J25.E16 J25.E18 J25.E19 J25.E21 J25.E22 J25.E24 J25.E25 J25.E27 J25.E28 J25.E30 J25.E31 J25.E33 J25.E34 J25.E36 J25.E37 J25.F4 J25.F5 J25.F7 J25.F8 J25.F10 J25.F11 J25.F13 J25.F14 J25.F16 J25.F17 J25.F19 J25.F20 J25.F22 J25.F23 J25.F25 J25.F26 J25.F28 J25.F29 J25.F31 J25.F32 J25.F34 J25.F35 J25.F37 J25.F38 J25.J2 J25.J3 J25.J6 J25.J7 J25.J9 J25.J10 J25.J12 J25.J13 J25.J15 J25.J16 J25.J18 J25.J19 J25.J21 J25.J22 J25.J24 J25.J25 J25.J27 J25.J28 J25.J30 J25.J31 J25.J33 J25.J34 J25.J36 J25.J37 J25.K1 J25.K4 J25.K5 J25.K7 J25.K8 J25.K10 J25.K11 J25.K13 J25.K14 J25.K16 J25.K17 J25.K19 J25.K20 J25.K22 J25.K23 J25.K25 J25.K26 J25.K28 J25.K29 J25.K31 J25.K32 J25.K34 J25.K35 J25.K37 J25.K38 J25.MH1 J25.MH2 J25.S1 J25.S2 K1.3 K1.4 M5.1 M6.1 M7.1 M8.1 RJ1.17 RJ1.18 RJ2.17 RJ2.18 SW1.1 SW1.4 SW1.5 SW1.6

## Keep-outs
Keep-Out Layer:
  the board outline again, w2

## Silkscreen, mask and mechanical layers (free items; w line width, h text height)
Top Overlay:
  lines w10: 1978,2674 1978,1116 ccw(c2128,1116) 2128,966 5178,966 ccw(c5178,1116) 5328,1116 5328,4166 ccw(c5178,4166) 5178,4316 2128,4316 ccw(c2128,4166) 1978,4166 1978,2824
  text "CAN 1" at 3561,5590 h60
  text "CAN 2" at 4011,5590 h60
  text "JTAG" at 6072,5506 h60
  text "SYS_RST" at 376.9,5255.85 h45 r90
  text "+12V" at 6412,5246.96 h60 r90
  text "USB23" at 660.01,5190 h60
  text "USB14" at 1392.01,5190 h60
  text "PS ETH" at 2122,5048 h60
  text "PL ETH" at 5180,5048 h60
  text "PS_LED3 / PS_LED4" at 520.2,4899.5 h45 r90
  text "+12V GND" at 6701.8,4703 h60 r90
  text "POW KEY" at 6764,4283.65 h60 r90
  text "DP" at 718,4131 h60 r90
  text "SATA4" at 410,3360.9 h60 r90
  text "SATA3" at 856,3360.9 h60 r90
  text "SATA2" at 1302,3360.9 h60 r90
  text "SATA1" at 1748,3360.9 h60 r90
  text "SFP+1" at 1740,2634.31 h60 r90
  text "SFP+2" at 1740,1964.31 h60 r90
  text "FMC" at 6470,1679.2 h120 r90
  text "SFP+3" at 1740,1294.31 h60 r90
  text "SFP+4" at 1740,624.31 h60 r90
  text "RK-XCZU15EG_F V1.0" at 2080,550 h150
  text "RS485 2" at 4281,328 h60
  text "RS485 1" at 4731,328 h60
Bottom Overlay:
  text "GND    2L      2H    GND    1L     1H" at 4346.55,5790 h60
  text "1A     1B    GND    2A     2B    GND" at 5086.55,120 h60

## Text inside footprints (layer, text, board x,y; h text height)
J6: Top Overlay "10" at 6564,5784 h40; Top Overlay "9" at 6564,5684 h40; Top Overlay "1" at 5702,5692 h40; Top Overlay "2" at 5692,5792 h40
J24: Top Overlay "40" at 1736,182 h40 r180; Top Overlay "39" at 1736,282 h40 r180; Top Overlay "2" at 4108,174 h40 r180; Top Overlay "1" at 4098,274 h40 r180